# Altium PCB NB3000XN.PcbDoc (part 71 of 71)
Units mil, origin at the board's own origin, x right, y up, seen from the top; angles counter-clockwise.
Board outline 9527.56 x 6929.77 mil, 6 copper layers (Top Layer, GND+SHIELD, MidLayer1, MidLayer2, P2 - 3V3+5V0, Bottom Layer), stack 62.375 mil thick; 832 components, 1027 nets, 4655 pads, 4981 vias.
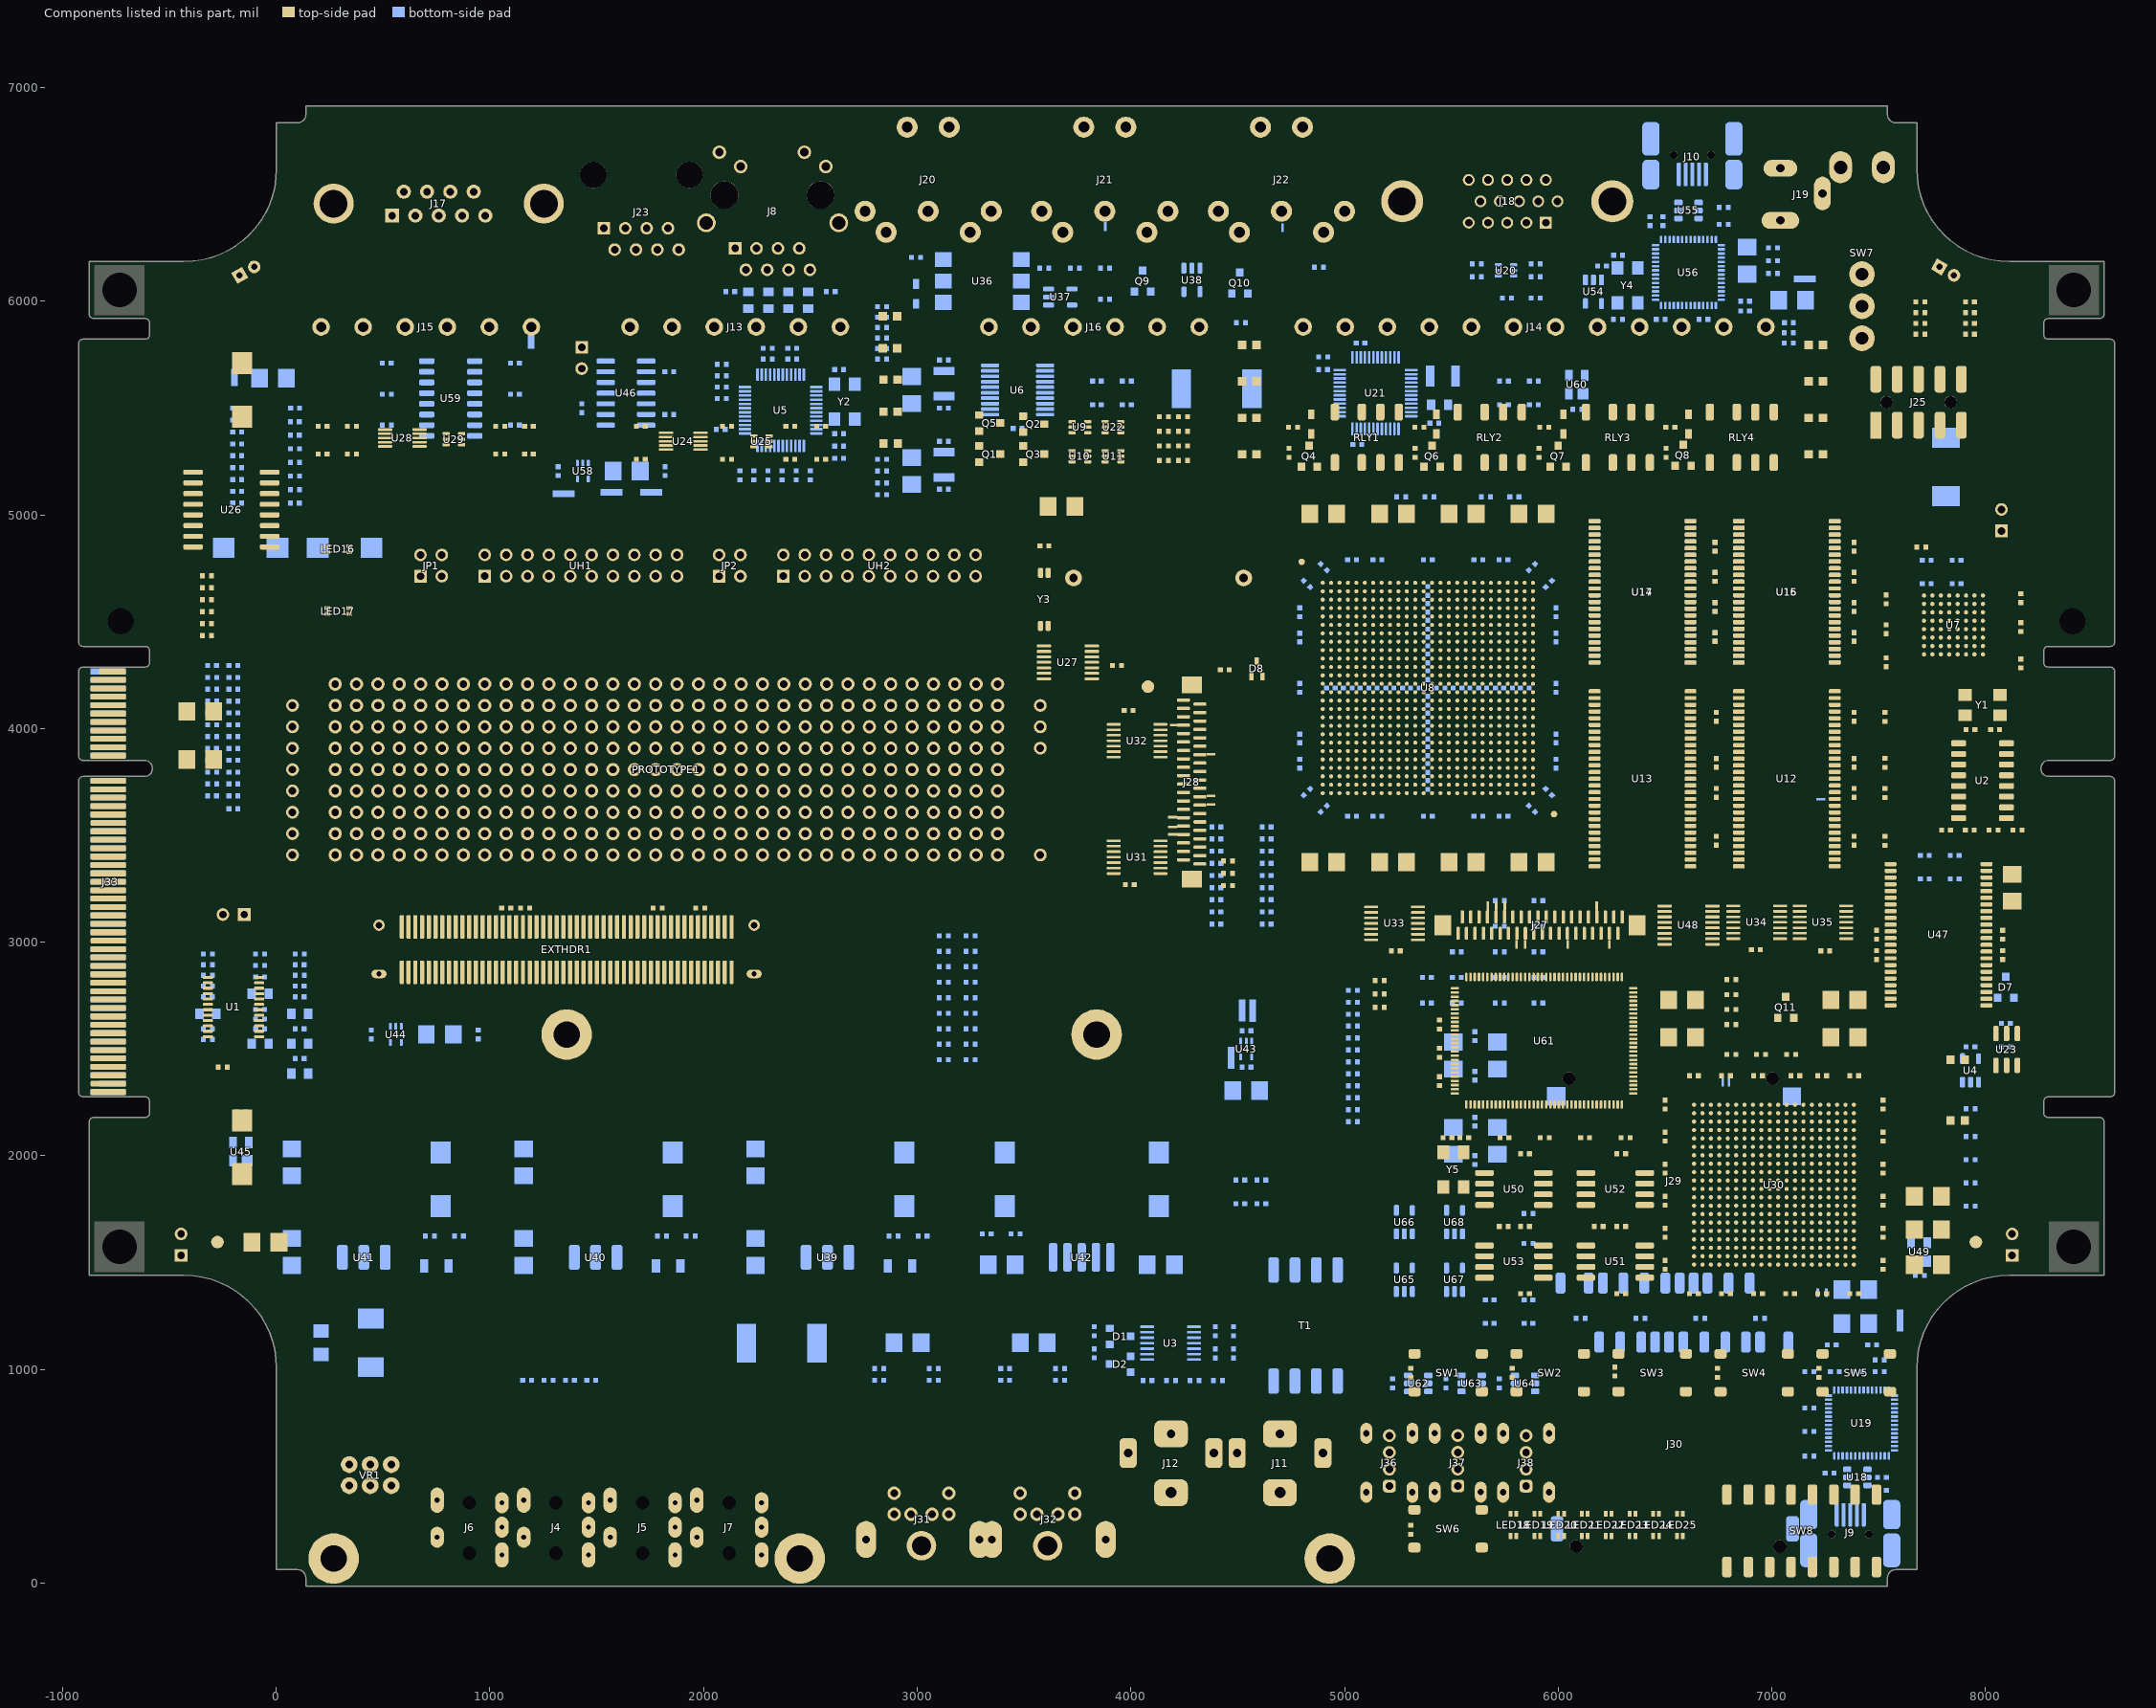
[diagram p75: the components of this part, seen from the top]

## Silkscreen, mask and mechanical layers (free items; w line width, h text height)
Top Overlay:
  drawing of 4403 lines, arcs and shapes, not listed
  text "RS232" at 604.45,6800 h90
  text "RS485" at 1610,6800 h90
  text "ETHERNET" at 2067.99,6800 h90
  text "SVGA VIDEO" at 5516.2,6800 h90
  text "HOST USB" at 6393.5,6800 h90
  text "5VDC" at 6937.6,6800 h90
  text "POWER" at 7217.89,6800 h90
  text "EIA-574" at 641.44,6725 h50
  text "10Mbps/FULL DUPLEX" at 1480,6725 h50
  text "10/100Mbps" at 2157.21,6725 h50
  text "24BIT/80MHZ" at 5623.41,6725 h50
  text "UNIVERSAL SERIAL BUS" at 6327.56,6725 h50
  text "6A MAX" at 6954.67,6725 h50
  text "ON/OFF" at 7282.58,6725 h50
  text "MIDI IN" at 2917.86,6640.83 h90
  text "MIDI THRU" at 3673.03,6640.83 h90
  text "MIDI OUT" at 4524.27,6640.83 h90
  text "MUSICAL INSTRUMENT" at 2792.21,6565.83 h50
  text "MUSICAL INSTRUMENT" at 3618.98,6565.83 h50
  text "MUSICAL INSTRUMENT" at 4445.75,6565.83 h50
  text "DIGITAL INTERFACE" at 2824.29,6520.83 h50
  text "DIGITAL INTERFACE" at 3651.07,6520.83 h50
  text "DIGITAL INTERFACE" at 4477.84,6520.83 h50
  text "5VDC" at 7170,6225 h80
  text "ADC2" at 2180.43,6180 h55
  text "ADC3" at 2377.28,6180 h55
  text "5V" at 193.92,6160 h60
  text "DAC0" at 342.27,6160 h55
  text "DAC1" at 539.12,6160 h55
  text "DAC2" at 735.97,6160 h55
  text "DAC3" at 932.82,6160 h55
  text "5V" at 1640,6160 h60
  text "ADC0" at 1786.73,6160 h55
  text "ADC1" at 1983.58,6160 h55
  text "5V" at 3319.7,6160.01 h60
  text "PWM0" at 3459.84,6160.01 h55
  text "PWM1" at 3656.69,6160.01 h55
  text "PWM2" at 3853.54,6160.01 h55
  text "PWM3" at 4050.39,6160.01 h55
  text "NC0" at 4756.79,6160 h55
  text "COM0" at 4934.36,6160 h55
  text "N00" at 5151.85,6160 h55
  text "NC1" at 5347.34,6160 h55
  text "COM1" at 5524.92,6160 h55
  text "NO1" at 5742.4,6160 h55
  text "NC2" at 5937.89,6160 h55
  text "COM2" at 6115.47,6160 h55
  text "NO2" at 6332.95,6160 h55
  text "NC3" at 6528.44,6160 h55
  text "COM3" at 6706.02,6160 h55
  text "NO3" at 6923.5,6160 h55
  text "PWM" at 4515,6040 h45
  text "RELAYS" at 7135.94,6039.99 h45
  text "RS485" at 1365,6035 h45
  text "ETHERNET STATUS" at 2797.74,6035 h45
  text "ACTIVE" at 4481.63,5980 h50
  text "ACTIVE" at 7133.34,5979.99 h50
  text "CHANNELS" at 4465.81,5940 h40
  text "CHANNELS" at 7117.52,5939.99 h40
  text "FULL DUPLEX" at 2797.74,5840 h60
  text "0" at 4640.05,5780 h50
  text "0" at 7291.76,5779.99 h50
  text "LINK" at 2797.66,5690.13 h60
  text "1" at 4644.59,5609.61 h50
  text "1" at 7296.3,5609.61 h50
  text "4x DIGITAL TO ANALOG CONVERTER" at 310,5585 h60
  text "4x ANALOG TO DIGITAL CONVERTER" at 1755,5585 h60
  text "4x PULSE WIDTH MODULATOR" at 3605,5585 h60
  text "4x ISOLATED COMMON/NORMALLY OPEN/NORMALLY CLOSED RELAYS" at 5490,5585 h50
  text "10Mbps" at 2800.53,5543.43 h60
  text "120R" at 1370,5500 h60
  text "TERM" at 1355,5445 h60
  text "2" at 4639.86,5439.23 h50
  text "2" at 7291.57,5439.22 h50
  text "100Mbps" at 2800.53,5393.64 h60
  text "ON" at 1390,5390 h60
  text "F05C" at 3776.17,5379.18 h20 r90
  text "F05C" at 3931.17,5379.18 h20 r90
  text "F05C" at 846.17,5323 h20 r90
  text "F05C" at 2286.17,5313 h20 r90
  text "84S08" at 605,5310 h24 r90
  text "84S02" at 1920,5295 h24 r90
  text "3" at 4640,5268.84 h50
  text "3" at 7291.71,5268.83 h50
  text "COLLISION" at 2800.53,5243.84 h60
  text "F05C" at 3776.17,5243 h20 r90
  text "F05C" at 3931.17,5243 h20 r90
  text "SYSTEM JTAG" at 7535,5215.53 h50
  text "PLATFORM" at 167.98,5055 h50
  text "STATUS" at 167.98,5005 h50
  text "PLATFORM" at 7621.98,4966 h50
  text "STATUS 1" at 192.18,4930 h50
  text "UPGRADE ENABLE" at 7609,4924 h35
  text "PT2300-S" at -160,4850 h50 r90
  text "2" at 583.66,4794.72 h39.37
  text "4" at 838.66,4794.72 h39.37
  text "2" at 1983.66,4794.72 h39.37
  text "4" at 2238.66,4794.72 h39.37
  text "3" at 2238.66,4694.72 h39.37
  text "1" at 593.66,4689.72 h39.37
  text "3" at 838.66,4689.72 h39.37
  text "1" at 1993.66,4689.72 h39.37
  text "STATUS 2" at 190,4640 h50
  text "32K768" at 3610,4536 h28 r90
  text "5V" at 698.66,4524.72 h70.87 r90
  text "5V" at 2098.66,4524.72 h70.87 r90
  text "3V3" at 2198.66,4509.72 h70.87 r90
  text "3V3" at 798.66,4499.72 h70.87 r90
  text "User Header A" at 1334.98,4485.26 h94.49
  text "User Header B" at 2735.98,4485.26 h94.49
  text "+" at 3783.68,4436.46 h80
  text "SRAM-256Kx16" at 6491.32,4375 h50 r90
  text "SRAM-256Kx16" at 7166.32,4375 h50 r90
  text "PCF2123" at 3735,4230 h28 r90
  text "S" at 4405.65,4118.23 h59.05
  text "GND" at -60,4095 h50
  text "32K" at 3624.39,4092.39 h50
  text "W" at 4398,4062 h53
  text "I" at 4417.2,4002.06 h59.05
  text "5V0" at -60,3995 h50
  text "GND" at 3620,3992.23 h50
  text "T" at 4406.01,3944.33 h59.05
  text "3V3" at -60,3895 h50
  text "+B" at 3640,3892.24 h50
  text "C" at 4404.55,3887.23 h59.05
  text "VHC04" at 4060,3876 h28 r90
  text "H" at 4405.9,3828.89 h59.05
  text "2V5" at -60,3795 h50
  text "&" at 4403.51,3771.12 h59.05
  text "L" at 4407.7,3713.44 h59.05
  text "1V8" at -60,3695 h50
  text "E" at 4406.66,3655.72 h59.05
  text "ICS307-02" at 8010,3625 h34 r90
  text "D" at 4405.2,3598 h59.05
  text "1V2" at -60,3595 h50
  text "DRAM-16Mx16" at 6491.32,3517.31 h50 r90
  text "DRAM-16Mx16" at 7166.32,3517.31 h50 r90
  text "I" at 4417.2,3512.21 h59.05
  text "AUL" at -60,3490 h50
  text "O" at 4402.7,3457 h59.05
  text "AUR" at -65,3395 h50
  text "BAT" at 3619.39,3392.39 h50
  text "VHC04" at 4060,3330 h28 r90
  text "GND" at 228.12,3300.23 h35
  text "1V2" at 328.12,3300.23 h35
  text "GND" at 428.12,3300.23 h35
  text "1V8" at 528.12,3300.23 h35
  text "GND" at 628.12,3300.23 h35
  text "2V5" at 728.12,3300.23 h35
  text "GND" at 2828.12,3300.23 h35
  text "3V3" at 2928.12,3300.23 h35
  text "GND" at 3028.12,3300.23 h35
  text "5V0" at 3128.12,3300.23 h35
  text "GND" at 3228.12,3300.23 h35
  text "+B" at 3328.12,3300.23 h35
  text "VHC04" at 6960,3026 h28 r90
  text "VHC04" at 7270,3026 h28 r90
  text "VHC04" at 5265,3020 h28 r90
  text "ATE" at -682.26,2995 h60
  text "XPT2406" at 6640,2992.16 h30 r90
  text "NANOCONNECT" at 1133.2,2945.23 h59.05
  text "NB3000XN.04" at 2710.45,2940 h120
  text "TOUCH SCREEN LCD IO" at 5602,2932 h59.05
  text "Xilinx Spartan 3AN" at 2710.45,2801.44 h100
  text "NB3000XN.04" at 3540,2801.44 h60
  text "SRAM-256Kx16" at 7876.32,2770 h50 r90
  text "CS4270" at -161.51,2573.97 h45 r90
  text "ISP1760" at 5808.3,2513.65 h50
  text "DS2502" at 8034,2468.01 h26
  text "PWR" at 7825,2365 h50
  text "PERIPHERAL BOARD" at 889.66,2310.23 h102.36
  text "PGM" at 7824.95,2080 h50
  text "25P80" at 5820,1775 h36 r90
  text "25P80" at 6295,1775 h36 r90
  text "25P80" at 5820,1435 h36 r90
  text "25P80" at 6295,1435 h36 r90
  text "USB2" at 5264.86,555.83 h90
  text "USB2" at 5589.86,555.04 h90
  text "USB2" at 5914.86,550.83 h90
  text "7" at 6778.45,540.42 h60
  text "6" at 6877.17,540.1 h60
  text "5" at 6978.15,540.1 h60
  text "4" at 7078,540.42 h60
  text "3" at 7177.86,540.1 h60
  text "2" at 7277.71,540.76 h60
  text "1" at 7381.56,540.42 h60
  text "0" at 7477.41,540.44 h60
  text "PORT 1" at 5288.55,490 h50
  text "PORT 2" at 5613.55,489.21 h50
  text "PORT 3" at 5938.55,485 h50
  text "HEADPHONES" at 735,480 h55
  text "LINE IN" at 1115.13,456 h60
  text "LINE OUT" at 1520.13,456 h60
  text "AMP TEST" at 1925.13,456 h60
  text "RGB USER LEDS" at 6170,424.03 h50
  text "PS2" at 2965,405 h60
  text "PS2" at 3555,405 h60
  text "L" at 816.84,404.14 h34
  text "R" at 974.84,404.14 h34
  text "L" at 1221.84,404.14 h34
  text "R" at 1379.84,404.14 h34
  text "L" at 1626.84,404.14 h34
  text "R" at 1784.84,404.14 h34
  text "L" at 2031.84,404.14 h34
  text "R" at 2189.84,404.14 h34
  text "USER DIP SWITCH" at 6853.16,219.61 h50
  text "SPDIF IN" at 4054.94,120.83 h75
  text "SPDIF OUT" at 4412.69,120.83 h75
  text "2" at 6334.69,91.1 h60
  text "7" at 5778.45,90.76 h60
  text "6" at 5890.29,90.44 h60
  text "5" at 6000.95,90.44 h60
  text "4" at 6112.19,90.76 h60
  text "3" at 6223.44,90.44 h60
  text "1" at 6450.92,90.76 h60
  text "0" at 6557.18,90.79 h60
  text "TEST/RESET" at 5320,35 h60
  text "VOLUME" at 448.47,25 h55
  text "KEYBOARD" at 2822.86,25.83 h80
  text "MOUSE" at 3474.94,25.83 h80
Bottom Overlay:
  drawing of 5178 lines, arcs and shapes, not listed
  text "2201" at 6591,6385 h28 r270
  text "F05C" at 5741,6113 h20 r270
  text "+" at -23.11,6080.76 h80 r270
  text "1G04" at 4333,6078 h28
  text "1G04" at 6212.16,6023 h28
  text "1G04" at 3663.57,5974.94 h28 r270
  text "+" at 7798.68,5943.06 h80
  text "FUSE" at 4474.37,5567.87 h80
  text "LVC244" at 3442,5503 h28 r270
  text "COMPLIANCE:" at 7334.41,5495.57 h45
  text "ISL8491IB" at 1615.05,5488.08 h28 r270
  text "RTL8201" at 2455,5470 h35
  text "CLASS 2" at 6584.41,5405.58 h40
  text "IPC-A-600G" at 7244.41,5405.57 h40
  text "HIN232ACBNZ" at 790,5380 h34 r270
  text "CLASS 2" at 6584.41,5325.58 h40
  text "TYPE 3" at 6834.41,5325.57 h40
  text "IPC-6012D" at 7244.41,5325.57 h40
  text ".Application_BuildNumber" at 4096.21,5237.03 h60
  text "AD BUILD No:" at 4460.98,5236.81 h34
  text "SRAM-256Kx16" at 6298.68,4375 h50 r270
  text "SRAM-256Kx16" at 6973.68,4375 h50 r270
  text "SD CARD" at 6794.22,3703.75 h120
  text "SDIO" at 6693.38,3510 h130
  text "SDHC" at 6717.02,3380 h130
  text "DESIGNED IN SYDNEY" at 5421,3126 h40
  text "AUSTRALIA" at 5315.43,3037 h50
  text "MANUFACTURE" at 7806.31,2995.59 h40
  text "DATE" at 7807.41,2928.79 h40
  text "1G04" at 7975.06,2393.57 h28
  text "3V3" at 266.21,2173.09 h32
  text "2V5" at 1351.21,2173 h32
  text "1V8" at 2436.14,2171 h32
  text "1V2" at 3626.14,2171 h32
  text "1G04" at 5325.06,1683.57 h28
  text "1G04" at 5560.06,1683.57 h28
  text "1G04" at 5325.06,1413.57 h28
  text "1G04" at 5560.06,1413.57 h28
  text "FUSE" at 2439.37,1097.87 h80
  text "HCU04" at 4155,1055 h28 r270
  text "2201" at 5355,975 h28 r90
  text "2201" at 5605,975 h28 r90
  text "2201" at 5855,975 h28 r90
  text "2201" at 7390,455 h28 r270
Bottom Paste:
  rectangle: 3618.53,1758.03 3918.53,2074
Top Solder:
  drawing of 369 lines, arcs and shapes, not listed
Bottom Solder:
  drawing of 373 lines, arcs and shapes, not listed
1. Boundary:
  lines w5: 4870,3670 5910,3670 5910,4710 4870,4710 4870,3670
16. Template Layer:
  lines w10: 1184,5532.61 ccw(c1184,5562.61) 1214,5562.61 ; 1214,5562.61 1214,5789.88 ccw(c1184,5789.88) 1184,5819.88 cw(c1184,5849.88) 1154,5849.88 1154,5905.73 cw(c1184,5905.73) 1184,5935.73 1264.78,5935.73 cw(c1264.78,5905.73) 1294.78,5905.73 1294.78,5502.61

## Text inside footprints (layer, text, board x,y; h text height)
J11: 8. Assembly - Bottom "Assign keep-out area to slot" at 4998.89,265.31 h11.81 r270; 8. Assembly - Bottom "Alert PCB fab to slot details" at 4979.2,265.31 h11.81 r270; 8. Assembly - Bottom "Mech 2 - Clearance, move to internal plane if present" at 4943.77,265.31 h11.81 r270; 8. Assembly - Bottom "Mech 1 - Slot cut-out" at 4963.45,265.31 h11.81 r270
J12: 8. Assembly - Bottom "Assign keep-out area to slot" at 4488.89,265.31 h11.81 r270; 8. Assembly - Bottom "Alert PCB fab to slot details" at 4469.2,265.31 h11.81 r270; 8. Assembly - Bottom "Mech 2 - Clearance, move to internal plane if present" at 4433.77,265.31 h11.81 r270; 8. Assembly - Bottom "Mech 1 - Slot cut-out" at 4453.45,265.31 h11.81 r270
J17: Bottom Overlay "1" at 541.88,6453.94 h39.37; Bottom Overlay "9" at 939.88,6556.11 h39.37
J18: Bottom Overlay "15" at 5542,6553 h39.37; Bottom Overlay "5" at 5537,6348 h39.37; Bottom Overlay "11" at 6032,6553 h39.37; Bottom Overlay "1" at 6002,6348 h39.37
J31: 8. Assembly - Bottom "PCB Edge" at 2755,35 h31.5 r180
J32: 8. Assembly - Bottom "PCB Edge" at 3345,35 h31.5 r180
J33: 1. Boundary "Edge Connector Side View" at -1250.55,4109.55 h39.37 r270; 1. Boundary "20° ± 5°" at -1167.87,4389.08 h39.37 r270; 1. Boundary "1.4mm" at -1167.87,4168.61 h39.37 r270; 1. Boundary "Board Thickness =1.57 ± 0.10 mm" at -982.83,4365.46 h39.37 r270
J36: 1. Boundary "PCB Edge" at 5268.95,161.81 h15.75
J37: 1. Boundary "PCB Edge" at 5588.95,162.2 h15.75
J38: 1. Boundary "PCB Edge" at 5908.95,161.81 h15.75
PBFREE: Bottom Overlay "Pb" at 4115.71,4837.13 h120
PCB1: Bottom Overlay "D-810-0050" at 1504,1140 h35
PROTOTYPE1: Top Overlay "IO35" at 3451.12,4044.13 h26 r270; Top Overlay "IO34" at 3451.12,4144.75 h26 r270; Top Overlay "IO33" at 3340.22,4283.23 h26; Top Overlay "IO32" at 3240.22,4283.23 h26; Top Overlay "IO31" at 3145.79,4283.23 h26; Top Overlay "IO30" at 3040.22,4283.23 h26; Top Overlay "IO29" at 2940.84,4283.23 h26; Top Overlay "IO28" at 2840.22,4283.23 h26; Top Overlay "IO27" at 2740.22,4283.23 h26; Top Overlay "IO26" at 2640.84,4283.23 h26; Top Overlay "IO25" at 2540.22,4283.23 h26; Top Overlay "IO24" at 2439.61,4283.23 h26; Top Overlay "IO23" at 2340.22,4283.23 h26; Top Overlay "IO22" at 2240.22,4283.23 h26; Top Overlay "IO21" at 2145.79,4283.23 h26; Top Overlay "IO20" at 2040.22,4283.23 h26; Top Overlay "IO19" at 1942.89,4283.23 h26; Top Overlay "IO18" at 1842.27,4283.23 h26; Top Overlay "IO17" at 1742.27,4283.23 h26; Top Overlay "IO16" at 1642.89,4283.23 h26; Top Overlay "IO15" at 1542.27,4283.23 h26; Top Overlay "IO14" at 1441.65,4283.23 h26; Top Overlay "IO02" at 240.22,4283.23 h26; Top Overlay "IO13" at 1342.27,4283.23 h26; Top Overlay "IO12" at 1242.27,4283.23 h26; Top Overlay "IO11" at 1147.84,4283.23 h26; Top Overlay "IO10" at 1042.27,4283.23 h26; Top Overlay "IO09" at 940.84,4283.23 h26; Top Overlay "IO08" at 840.22,4283.23 h26; Top Overlay "IO07" at 740.22,4283.23 h26; Top Overlay "IO03" at 340.22,4283.23 h26; Top Overlay "IO06" at 640.84,4283.23 h26; Top Overlay "IO35" at 540.22,4283.23 h26; Top Overlay "IO04" at 439.61,4283.23 h26; Top Overlay "IO01" at 201.12,4072.96 h26 r90; Top Overlay "IO00" at 201.12,3972.34 h26 r90
RLY1: Top Overlay "IM03GR" at 5010.12,5453.66 h34 r270
RLY2: Top Overlay "IM03GR" at 5585.12,5453.66 h34 r270
RLY3: Top Overlay "IM03GR" at 6185.12,5453.66 h34 r270
RLY4: Top Overlay "IM03GR" at 6765.12,5453.66 h34 r270
U39: Bottom Overlay "1" at 2777.86,1527 h39.37
U40: Bottom Overlay "1" at 1692.86,1527 h39.37
U41: Bottom Overlay "1" at 607.86,1527 h39.37
U42: Bottom Overlay "1" at 3967.86,1527 h39.37
UH1: Top Overlay "18" at 1796.12,4883.23 h39.37 r90; Top Overlay "17" at 1796.12,4583.23 h39.37 r90; Top Overlay "14" at 1596.12,4883.23 h39.37 r90; Top Overlay "13" at 1596.12,4583.23 h39.37 r90; Top Overlay "10" at 1396.12,4883.23 h39.37 r90; Top Overlay "9" at 1395.98,4614.26 h39.37 r90; Top Overlay "8" at 1296.12,4883.23 h39.37 r90; Top Overlay "7" at 1296.98,4613.26 h39.37 r90; Top Overlay "4" at 1096.12,4883.23 h39.37 r90; Top Overlay "3" at 1097.98,4614.26 h39.37 r90; Top Overlay "5" at 1195.98,4613.26 h39.37 r90; Top Overlay "11" at 1496.12,4598.23 h39.37 r90; Top Overlay "15" at 1696.12,4583.23 h39.37 r90; Top Overlay "6" at 1196.12,4883.23 h39.37 r90; Top Overlay "12" at 1496.12,4883.23 h39.37 r90; Top Overlay "16" at 1696.12,4883.23 h39.37 r90; Top Overlay "20" at 1896.12,4883.23 h39.37 r90; Top Overlay "19" at 1896.12,4583.23 h39.37 r90; Top Overlay "1" at 995.98,4622.26 h39.37 r90; Top Overlay "2" at 996.12,4883.23 h39.37 r90
UH2: Top Overlay "18" at 3193.76,4883.23 h39.37 r90; Top Overlay "17" at 3193.76,4583.23 h39.37 r90; Top Overlay "14" at 2993.76,4883.23 h39.37 r90; Top Overlay "13" at 2993.76,4583.23 h39.37 r90; Top Overlay "10" at 2793.76,4883.23 h39.37 r90; Top Overlay "9" at 2793.98,4613.26 h39.37 r90; Top Overlay "8" at 2693.76,4883.23 h39.37 r90; Top Overlay "7" at 2693.98,4612.26 h39.37 r90; Top Overlay "4" at 2493.76,4883.23 h39.37 r90; Top Overlay "3" at 2493.98,4612.26 h39.37 r90; Top Overlay "5" at 2593.98,4611.26 h39.37 r90; Top Overlay "11" at 2893.76,4598.23 h39.37 r90; Top Overlay "15" at 3093.76,4583.23 h39.37 r90; Top Overlay "6" at 2593.76,4883.23 h39.37 r90; Top Overlay "12" at 2893.76,4883.23 h39.37 r90; Top Overlay "16" at 3093.76,4883.23 h39.37 r90; Top Overlay "20" at 3293.76,4883.23 h39.37 r90; Top Overlay "19" at 3293.76,4583.23 h39.37 r90; Top Overlay "1" at 2393.98,4618.26 h39.37 r90; Top Overlay "2" at 2393.76,4883.23 h39.37 r90